# Altium PCB V3_Board.PcbDoc (part 6 of 7)
Units mil, origin at the board's own origin, x right, y up, seen from the top; angles counter-clockwise.
Board outline 6915 x 4422 mil, 2 copper layers (Top Layer, Bottom Layer), stack 57 mil thick; 364 components, 243 nets, 1048 pads, 599 vias.
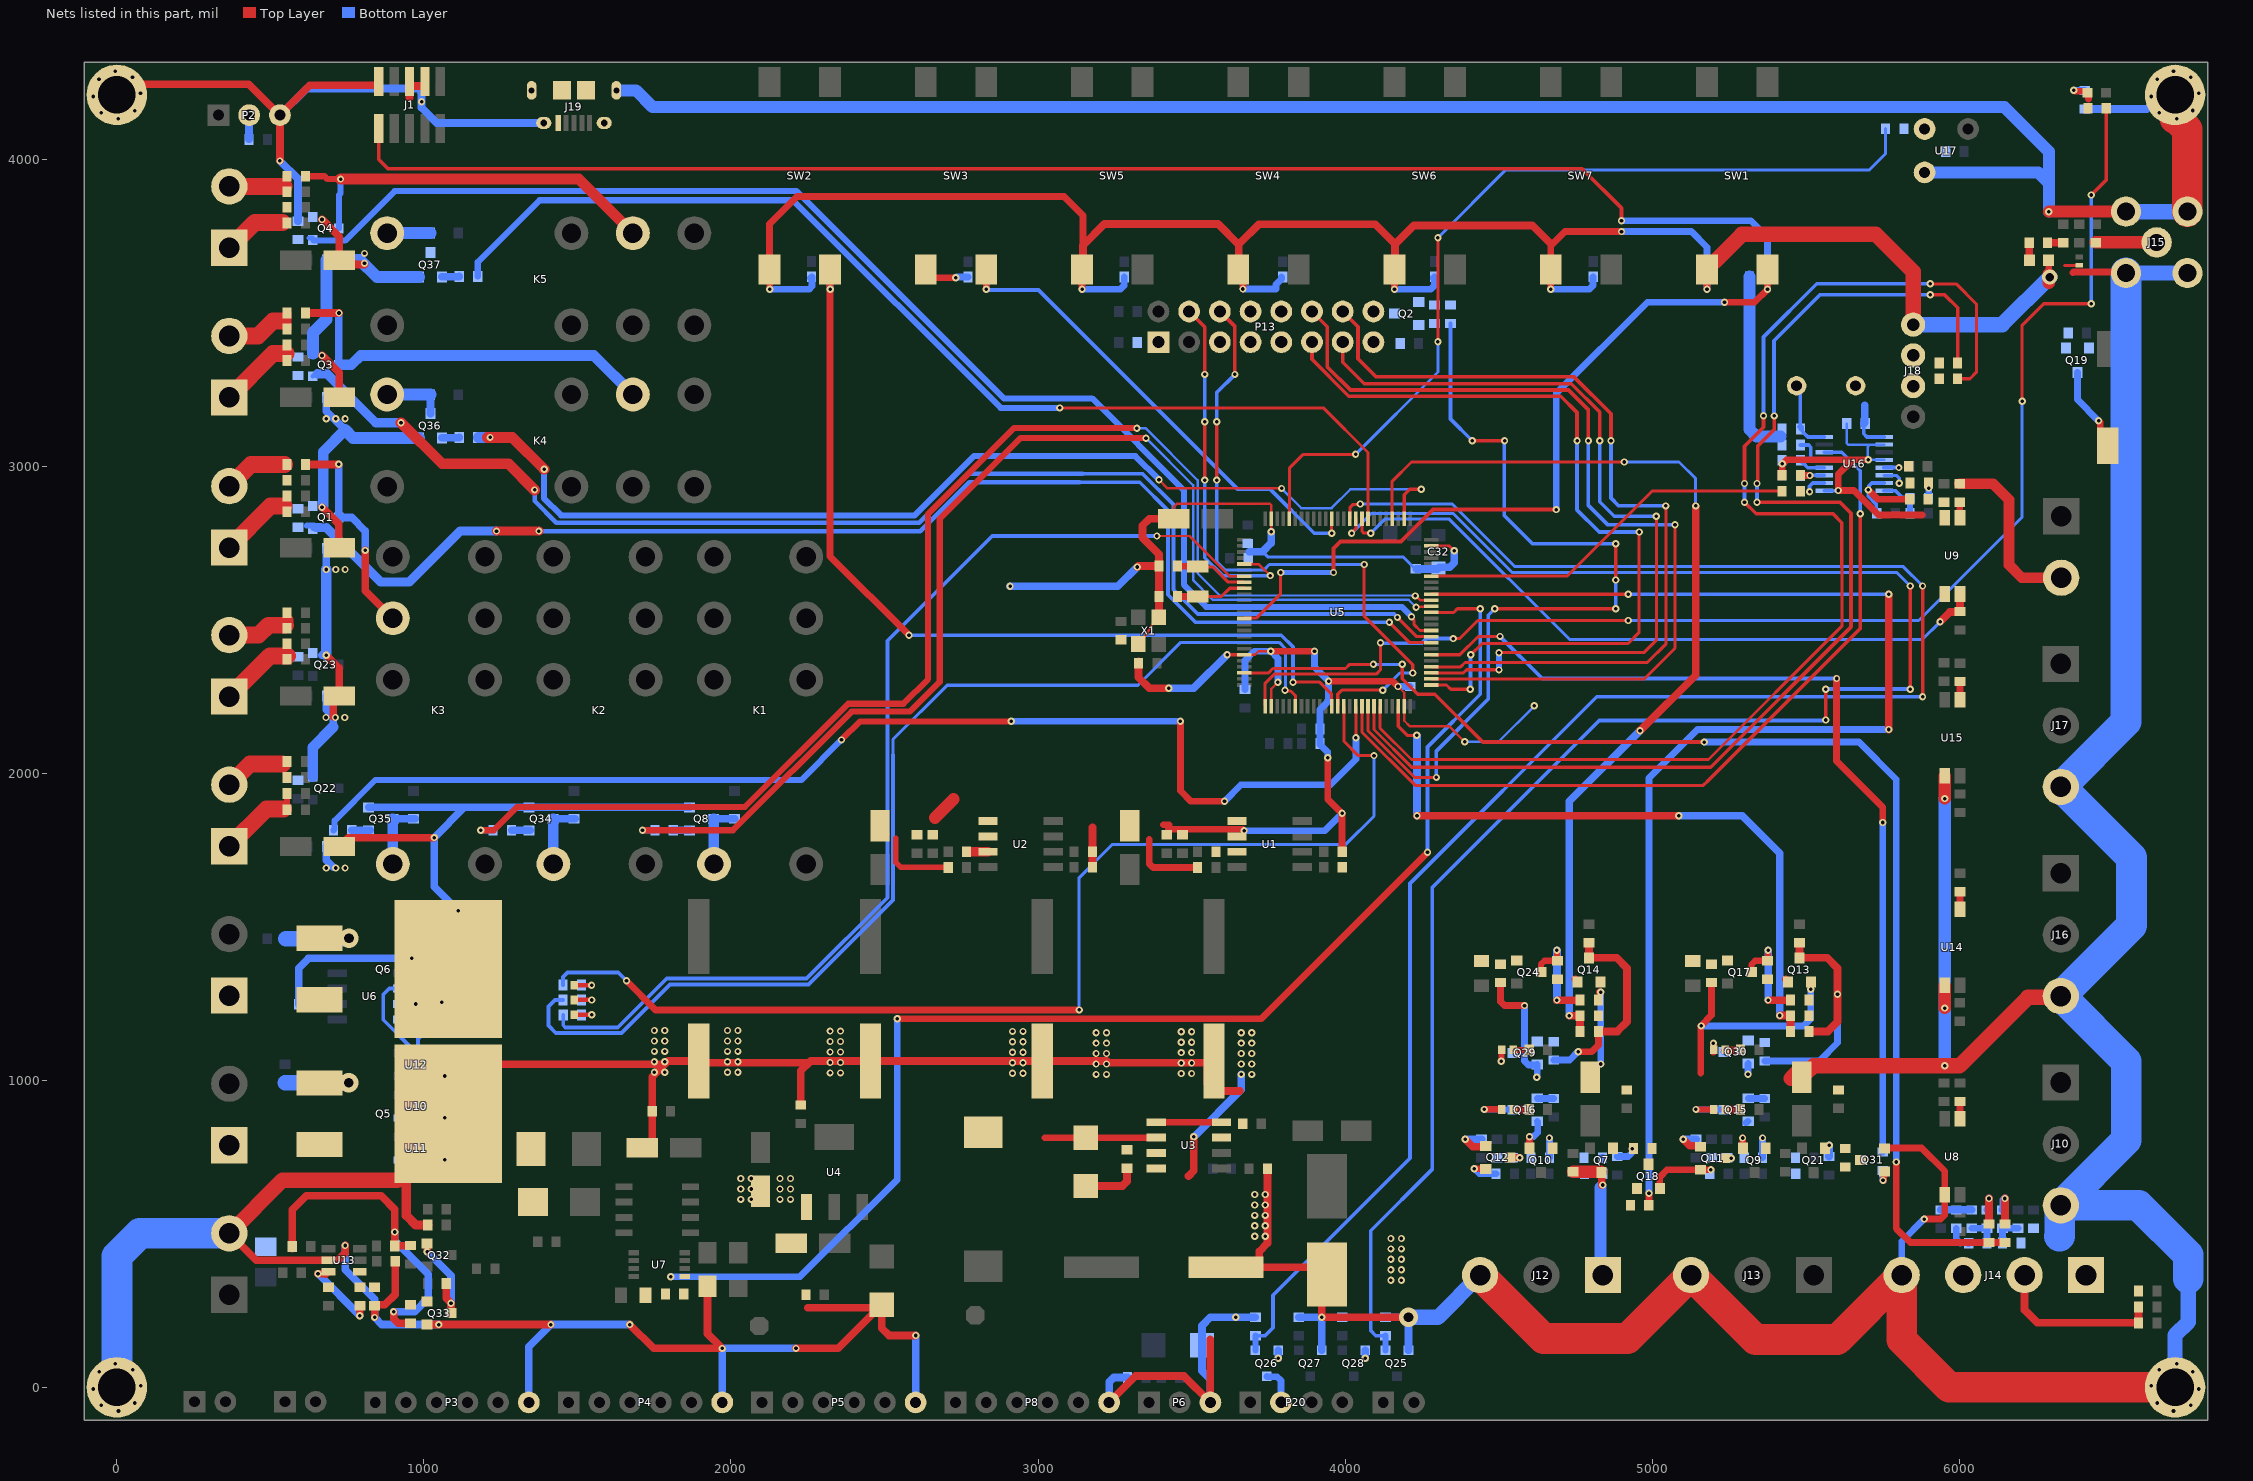
[diagram p3: the nets of this part, all layers, seen from the top]

## Via types
v1: diameter 23.62, hole 11.81, Top Layer to Bottom Layer, 557 vias
v2: diameter 62.99, hole 31.5, Top Layer to Bottom Layer, 31 vias
v3: diameter 50, hole 28, Top Layer to Bottom Layer, 11 vias

## Nets (pads, with @x,y where several pads share a name; then routed paths per layer and width w, separated by ;. In a path a pad name is that pad's centre, name@x,y a point inside that pad or via, vN(x,y) a via of type N, cw(c..) or ccw(c..) an arc to the next point about the centre after c; other vN are vias at no path point) (continued)
GND: C1.2 C2.1 C3.2 C4.2 C5.2 C6.2 C7.2 C8.2 C9.2 C10.2 C11.2 C12.2 C13.2 C14.2 C15.2 C16.2 C17.2 C18.2 C19.2 C20.1 C21.2 C22.2 C23.2 C24.2 C25.2 C26.2 C27.2 C28.2 C29.2 C30.2 C31.2 C32.2 C33.2 C34.1 C35.1 C36.2 C37.1 C38.1 C39.1 C40.1 C41.1 C42.2 C43.2 C44.1 C45.2 C46.2 C47.2 C48.2 C49.2 C50.2 C51.2 C52.2 C53.1 C54.2 C55.2 C57.1 C58.2 C59.2 C60.1 C61.2 C62.2 C63.2 C64.2 C65.2 C66.2 C67.2 C68.2 C69.2 C70.2 C71.1 C72.1 C73.1 C76.2 C78.1 C79.1 D1.2 D2.2 D3.1 J1.3 J1.5 J1.9 J2.2 J10.3 J12.3 J13.3 J14.3 J14.4 J15.2 J15.3 J15.4 J15.5 J16.3 J17.3 J18.1 J19.5 J19.MH1 J19.MH2 J19.MH3 J19.MH4 J19.MP1 J19.MP2 L3.2 L4.2 P2.3 P3.6 P4.6 P5.6 P6.3 P8.6 P13.1 P13.5 P13.7 P13.8 P13.9 P13.10 pad.MH1 Q1.2 Q2.2 Q3.2 Q4.2 Q5.2 Q6.2 Q8.2 Q9.2 Q10.2 Q11.2 Q12.2 Q13.2 Q14.2 Q15.2 Q16.2 Q18.2 Q19.2 Q22.2 Q23.2 Q25.2 Q26.2 Q27.2 Q28.2 Q29.2 Q30.2 Q31.2 Q33.2 Q34.2 Q35.2 Q36.2 Q37.2 R2.1 R4.2 R6.2 R7.1 R9.2 R10.1 R13.1 R26.2 R32.2 R34.2 R53.1 R59.1 R61.2 R65.1 R67.2 R69.2 R70.2 R72.2 R73.2 R74.2 R75.2 R83.2 R84.2 R86.1 R88.1 R91.1 R92.1 R97.2 R98.2 R103.2 R105.1 R113.1 SB6.2 SB41.2 SB42.2 SW1.1 SW2.1 SW3.1 SW4.1 SW5.1 SW6.1 SW7.1 U1.5 U1.6 U2.5 U2.6 U3.4 U4.1 U5.20 U5.27 U5.49 U5.74 U5.99 U6.3 U8.3 U9.2 U9.3 U10.3 U11.3 U12.3 U13.2 U14.3 U15.3 U16.2 U16.4 U16.9 U17.3 X1.2 X1.4 | length 55020.6
  Top Layer w8: X1.2@3326.54,2421.69 3350,2449 3373.84,2486.72 X1.4@3393.46,2508.31 ; C31.2@3442.13,2829 3442.13,2868.13 3452,2878 3754.65,2878 3759.33,2873.31 U5.99@3759.33,2829.28 v1(3759.33,2787) ; U5.20@3670.75,2386.36 3706.36,2386.36 3717.81,2397.81 v1(3758,2397.81) ; U5.27@3759.33,2219.04 3759.33,2275.33 v1(3781,2297) ; v1(4172,2283) 4192.4,2262.6 U5.49@4192.4,2219.04 4192.4,2171.4 4209.81,2154 4338,2154 v1(4389,2103)
  Top Layer w10: v1(3615.64,2386.36) U5.20@3670.75,2386.36 ; U5.74@4280.99,2740.69 4339.31,2740.69 v1(4355,2725) ; 6341.78,3654.22 L3.2@6390,3654.22
  Top Layer w18: 2537,1789.09 2537,1710.43 2553.54,1693.89 C18.2@2707.52,1693.89
  Top Layer w22: SW2.1@2126.02,3641.04 2126.02,3789.02 2215,3878 3085,3878 3146.62,3816.38 3146.62,3719.24 ; v1(2126.3,3576) SW2.1@2126.3,3640.76 ; SW3.1@2634.63,3641.04 2634.63,3638.43 2659.07,3614 v1(2732,3614) ; v1(3143.53,3576) SW5.1@3143.53,3640.76 ; 3362,1786 3362,1706.78 3374.89,1693.89 C6.2@3519.52,1693.89 ; 3408.5,1832.5 3427,1832.5 ; 3424,1818.5 3665.5,1818.5 v1(3671,1813) ; SW4.1@3652.15,3640.76 3667,3625.91 v1(3667,3577) ; v1(3758,2397.81) v1(3900,2397.81) ; v1(3943,2051) 3943,1917 v1(3990,1870) 3989.69,1869.69 3989.69,1745.73 C10.2@3990.52,1744.89 ; v1(3946.07,2300.19) 3946.38,2299.88 4155.12,2299.88 v1(4172,2283) ; v1(4160.77,3576) SW6.1@4160.77,3640.76 ; v1@4420.31,712.8 Q12.2@4457.43,712.8 ; R98.2@4506,1319 4506,1256.89 4518.89,1244 v1(4584,1244) ; Q10.2@4599.6,779.48 4599.8,779.68 4599.8,816.8 v1(4600,817) ; SW7.1@4669.1,3641.04 4669.1,3717.1 4716,3764 v1(4899.47,3764) ; v1(4669.38,3576) SW7.1@4669.38,3640.76 ; v1@4827,1288 v1(4832,1288) ; Q18.2@5024.4,648.63 5024.4,686.4 5047.6,709.6 Q11.2@5156.63,709.6 5156.93,709.3 v1(5190.7,709.3) ; 5158,1024.17 v1@5158,1178 ; v1@5158.25,1178 5158.56,1178 5159.81,1179.25 5159.81,1179.81 5193,1213 R97.2@5193,1319 ; v1(5178,3576) SW1.1@5178,3640.76 ; v1@5294.3,813 5294.3,779.78 Q9.2@5294.6,779.48 ; SB41.2@5422,2971 5422.69,2971.69 5422.69,3007.69 v1(5423,3008) 5423.44,3008 5436.44,3021 5653,3021 ; v1(5703,3021) 5653,3021 ; Q31.2@5762.37,779.4 5768.83,779.4 5769.48,780.05 5876.95,780.05 5952,705 U8.3@5952,627.98 5952,561.89 5939.11,549 v1(5885,549) ; 5879,2841 5737,2841 5657,2921 v1(5605,2921) 5605,2973 5653,3021 ; L4.2@6289.91,3671 6290.69,3670.22 6290.69,3625.31 v3@6291,3625 ; 6369,3630 6371.5,3632.5 6538.5,3632.5 J15.4@6542,3629
  Top Layer w25: pad.MH1@1.14,4208.89 36.45,4244.2 430.77,4244.2 P2.3@531.83,4143.14 ; J2.2@366.94,502.72 454.49,415.17 U13.2@689.96,415.17 690.26,415.47 720.47,415.47 744,439 v1(744,463) ; v1(531.83,3994.17) P2.3@531.83,4143.14 ; v1(669,2866.76) 723.83,2811.93 C24.2@723.83,2733 ; v1(669,3360.77) 725.01,3304.76 C65.2@725.01,3225.17 ; v1(669,3803.31) 725.01,3747.3 C67.2@725.01,3671.17 761.42,3671.17 775.59,3657 v1@807,3657 ; v1(683,2385) 725.01,2342.99 C63.2@725.01,2252.17 724,2252.17 705,2233.18 v1@705,2185 ; C61.2@725.18,1762 C61.2@725.01,1762.17 753.83,1791 v1(1034,1791) ; v1(840.14,228.94) R32.2@840.14,267.17 842.64,269.67 873.15,269.67 907,303.52 C69.2@907,412 ; J1.9@853.84,4239.99 628.67,4239.99 P2.3@531.83,4143.14 ; Q5.2@943,754.61 Q5.2@1073.72,885.33 ; 953.84,4199.63 953.84,4239.99 955.91,4237.92 J1.3@1001.77,4237.92 ; Q33.2@1010.63,205.6 v1(1048.86,205.6) v1(1414,205.6) ; Q5.2@1080.55,892.16 1241.39,1053 v1@1785,1053 ; v1(1671,205.6) 1748.6,128 v1(1971.89,128) 1924,175.89 R65.1@1924,330 ; C1.2@1711.76,781.02 1724.77,781.02 1743.77,800.02 C3.2@1743.77,900.12 1743.77,1011.77 v1@1785,1053 ; v1(2212,128) 2349.09,128 D2.2@2481.09,260 ; C26.2@2227.51,920.28 2227.51,1031.51 2259.6,1063.6 ; 2251,260 D2.2@2481.09,260 ; C17.2@2485.57,1828.98 2485.57,1819.11 C17.2@2504.57,1800.11 ; v1(2601.64,170) 2515,170 2491.29,193.71 D2.2@2491.29,270.2 D2.2@2481.09,260 ; C19.2@2657.31,1800.11 C19.2@2659.81,1800.11 ; SW5.1@3143.25,3641.04 3146.62,3644.41 3146.62,3719.24 3216.38,3789 3585.86,3789 3653.72,3721.14 ; D1.2@3155.27,656.61 3274.87,656.61 3289.52,671.26 C20.1@3289.52,714.78 ; C14.2@3177.52,1694.89 C15.2@3177.52,1744.89 3177.52,1824 ; P8.6@3231.39,-47.83 3317.22,38 3475.31,38 P6.3@3561.14,-47.83 3561.14,157.14 ; v1(3323,2672) 3326,2675 C53.1@3393.73,2675 ; C35.1@3327,2359 3327,2313 3363,2277 v1(3426,2277) ; C35.1@3327.77,2364.23 C35.1@3329,2363 ; X1.4@3393.46,2508.31 3393.73,2508.57 C53.1@3393.73,2675 ; C31.2@3442.13,2829 3363,2829 3340,2806 3340,2768 3394,2714 C53.1@3394,2675 C53.1@3393.73,2675 ; 3489.99,689.09 3507,706.1 v1(3507,817) ; C5.2@3573.22,1063.6 3573.22,987.95 C5.2@3595.17,966 ; C16.2@3611.96,392.13 C16.2@3698.36,392.13 ; SW4.1@3654,3642.61 3654,3722.62 3719.38,3788 4097.62,3788 4161.1,3724.52 ; 3657,966 C5.2@3595.17,966 ; R2.1@3747,713 3747,470 3720.31,443.31 3720.31,414.07 C16.2@3698.36,392.13 ; SW6.1@4160.77,3640.76 4162,3641.99 4162,3722 4224,3784 4609,3784 4669.1,3723.9 ; v2(4205.95,229.35) v1(3924.04,229.35) 3924.04,351.45 C9.2@3941.09,368.5 3917.47,392.13 C16.2@3698.36,392.13 ; v1@1785,1053 1795.6,1063.6 C12.2@1895.22,1063.6 1900.32,1058.5 2254.5,1058.5 2259.6,1063.6 ; 2259.6,1063.6 C13.2@2454.56,1063.6 C7.2@3013.89,1063.6 3223,1063.6 3228.91,1057.69 3551.28,1057.69 3551.28,987.95 3573.22,966 C5.2@3595.17,966
  Top Layer w30: Q5.2@943,754.61 943,561 974,530 R34.2@1013,530
  Top Layer w39.37: v1(5952,1236) U14.3@5952,1309.98 ; v1(5952,1918) U15.3@5952,1991.98 ; v3@6290.69,3596.23 v3@6290.69,3625.31 ; v1(6291,3829) J15.3@6542,3829
  Top Layer w40: 2664.5,1855.5 2725,1916
  Top Layer w50: J2.2@366.94,502.72 540.22,676 914.39,676 1080.55,842.16 Q5.2@1080.55,892.16 ; SW1.1@5177.72,3641.04 5177.72,3654.82 5188.15,3665.25 5201.93,3665.25 5291.67,3755 5728,3755 5849,3634 J18.1@5849,3461 ; 5451.59,1006.59 C43.2@5471.23,1026.23 ; C43.2@5487,1010.45 C43.2@5502.77,1026.23 ; C43.2@5493.5,1026.23 5493.5,1036.64 5513.18,1036.64 5524.55,1048 v1(5952,1048) 6000,1048 6222.71,1270.71 6325.71,1270.71 J16.3@6330,1275
  Top Layer w100: J12.3@4439.17,366.64 4645.81,160 4919.54,160 J13.3@5126.17,366.64 5335.81,157 5602.36,157 J14.4@5812,366.64 5812,156 5966.82,1.18 pad.MH1@6701.82,1.18 ; pad.MH1@6701.82,4131.99 pad.MH1@6701.82,4208.82 ; v1(6706.82,4131.99) 6742,4096.81 J15.2@6742,3829
  Bottom Layer w8: C33.2@4227.16,2666.33 C33.2@4229.66,2666.33 ; v1(4389,2103) 4499,2103 v1(4616,2220) ; U16.9@5559.56,2920.5 U16.9@5559.81,2920.75 ; C71.1@5633,3139 5633,3075.19 5637.69,3070.5 5708.5,3070.5 ; U16.4@5754.44,3020.5 5754.19,3020.75 5703.25,3020.75 v1(5703,3021) 5701,3023 5701,3063 5708.5,3070.5 ; U16.2@5754.44,3070.5 5708.5,3070.5
  Bottom Layer w10: 3730.8,2721.8 3747.59,2705 4188.49,2705 C33.2@4227.16,2666.33
  Bottom Layer w12: U16.9@5559.81,2920.75 5604.75,2920.75 v1(5605,2921)
  Bottom Layer w22: C25.2@683.05,2733.09 C25.2@683.14,2733.17 ; v1(2126.3,3576) 2254,3576 2264,3586 2264,3615.94 C37.1@2262.94,3617 C37.1@2258.94,3613 ; v1(2732,3614) 2732.44,3614 2734.44,3616 C38.1@2772.3,3616 ; v1(3143.53,3576) 3267.52,3576 3280.41,3588.89 C40.1@3280.41,3616 ; v1(3667,3577) 3774.64,3577 3774.64,3591.61 3792.53,3609.5 C39.1@3792.53,3616 ; v1(3671,1813) 3933,1813 v1(3990,1870) ; C29.2@3674,2273 3674,2368 3703.81,2397.81 v1(3758,2397.81) 3781,2374.81 v1(3781,2297) ; v1(3900,2397.81) 3900,2346.26 v1(3946.07,2300.19) 3946,2300.12 3946,2236 3918,2208 R13.1@3918,2145 C36.2@3918,2097 3918,2094.5 3943,2069.5 v1(3943,2051) ; v1(4160.77,3576) 4277.7,3576 4290.59,3588.89 C41.1@4290.59,3617 C41.1@4286.59,3613 ; v1(4172,2283) C27.2@4212.23,2283.01 ; v1(4420.11,713) 4420.55,713 4436.55,697 C47.2@4491,697 ; v1(4584,1244) 4584,1063.89 4596.89,1051 4623.77,1051 Q29.2@4625.37,1052.6 4625.37,1012.37 v1(4624,1011) ; v1(4600,817) 4600.31,817.31 4613.61,817.31 4627,830.7 4627,865.97 Q16.2@4625.37,867.6 ; v1(4669.38,3576) 4793.8,3576 4806.69,3588.89 4806.69,3615.94 C57.1@4807.74,3617 ; v1(4832,1054) v1(4832,1288) ; v1(4899.47,3764) 5127,3764 5178,3713 v1(5178,3576) ; v1(5159,1178) 5492,1178 5516,1202 v1(5516,1297) ; Q15.2@5305.26,862.46 5310.4,867.6 Q15.2@5312.37,867.6 ; v1(5311.31,1020.81) 5311.62,1021.12 5311.62,1054.85 Q30.2@5312.37,1055.6 ; J14.4@5812,366.64 5812,476 v1(5885,549) ; R105.1@5899,2895.67 5899.69,2896.36 5899.69,2928.69 v1(5900,2929) ; R113.1@5989.33,519 5989.33,483.83 6002.22,470.95 ; J14.3@6012,366.64 J14.3@6029,383.64 ; C79.1@6027.05,470.95 6029,469 C79.1@6030,470
  Bottom Layer w25: J2.2@366.94,502.72 J2.2@381.09,502.72 ; v1(531.83,3994.17) 590.86,3935.14 R9.2@590.86,3798 ; P2.3@531.83,4143.14 618.69,4230 C51.2@994,4230 993,4229 993,4167 1042.3,4117.7 J19.MH2@1390.78,4117.7 ; C55.2@593.14,1248.17 593.14,1366.14 625,1398 v1(961,1398) ; 669,2385 v1@672.5,2388.5 ; v1(669,2866.76) v1@672.5,2870.26 ; C62.2@682.14,1762.17 C62.2@683.14,1762.17 683.14,1716.86 v1@705,1695 ; v1(683,2664) 683.05,2664.05 C25.2@683.05,2733.09 ; C64.2@683.14,2252.17 683.14,2206.86 705,2185 705,2151 ; C66.2@683.14,3224.17 683.14,3178.86 744,3118 ; v1(744,463) 744,384 840.14,287.86 v1(840.14,228.94) 863.49,205.6 v1(1048.86,205.6) ; Q35.2@820.63,1889.4 1132.4,1889.4 ; U6.3@931.37,1249.4 v1(973.82,1249.4) ; U11.3@1026.32,741.77 1026.55,742 v1(1069,742) ; U10.3@1026.55,878.5 v1(1069,878.5) ; U12.3@1026.55,1015 v1(1069,1015) ; R84.2@1058.14,1199.17 1058.14,1255.27 v1(1058.37,1255.49) R83.2@1058.37,1297.94 ; v1(1112,1553) 1034,1631 v1(1034,1791) 1132.4,1889.4 ; P3.6@1342.14,-47.83 1342.14,133.74 v1(1414,205.6) v1(1671,205.6) ; Q8.2@1865.26,1889.4 Q34.2@1342.63,1889.4 1132.4,1889.4 ; P4.6@1971.89,-47.83 v1(1971.89,128) v1(2212,128) ; P5.6@2601.64,-47.83 v1(2601.64,170) ; v1(2909,2609) 3260,2609 v1(3323,2672) ; P8.6@3231.39,-47.83 3231.39,18.53 3246.04,33.17 C52.2@3291.14,33.17 ; v1(3426,2277) 3506.27,2277 v1(3615.64,2386.36) ; v1(3507,817) 3508,817 3662,971 v1(3662,1020) ; P6.3@3561.14,-47.83 3561.14,27.86 3533.88,55.12 D3.1@3533.88,138.17 3533.88,201.88 3561,229 v1(3644,229) 3644.17,229.17 R73.2@3707.73,229.17 ; 3687.96,2721.8 3730.8,2721.8 3759.33,2750.33 v1(3759.33,2787) ; v1(3782.54,96) Q26.2@3782.54,121.5 ; R74.2@3849.23,229.17 v1@3924.04,229.17 ; Q27.2@3924.04,121.5 v1@3924.04,229.17 ; v1(3924.04,229.35) v1@3924.04,229.17 ; v1(4065.54,96) Q28.2@4065.54,121.5 ; R72.2@4131.14,229.17 v2@4183.7,229.17 ; v2@4183.88,229.35 v2(4205.95,229.35) Q25.2@4205.95,121.5 ; C33.2@4232.16,2665.33 4300.67,2665.33 C32.2@4304,2668.65 4306.35,2671 4340.36,2671 4355,2685.64 v1(4355,2725) ; 6430,4163 6609.5,4163 6655.32,4208.82 pad.MH1@6701.82,4208.82
  Bottom Layer w35: Q22.2@638.54,1989.57 638.54,2084.54 705,2151 ; v1@672.5,2870.26 672.5,3046.5 744,3118 ; v1(683,2385) v1(683,2664)
  Bottom Layer w39.37: Q3.2@639,3367.57 639,3434 683.14,3478.14 C68.2@683.14,3671.17 792.83,3671.17 847.37,3616.63 Q37.2@984.6,3616.63 ; 744,3118 769.39,3092.61 Q36.2@984.6,3092.61 ; J19.MH3@1635,4224 1691,4224 1745.08,4169.92 ; 1752,4169.92 6146.08,4169.92 6291,4025 6291,3922 ; C73.1@5316,3617 5316,3120.06 5339.06,3097 5417,3097 ; U17.3@5886.58,3956.58 6256.42,3956.58 6291,3922 ; v1@5952,1044 v1(5952,1048) v1(5952,1236) v1(5952,1918) ; v1(6291,3829) 6291,3922
  Bottom Layer w50: v2(4205.95,229.35) 4301.88,229.35 J12.3@4439.17,366.64 ; J18.1@5849,3461 6139,3461 v3(6294,3616) ; J15.4@6542,3629 J15.5@6742,3629 ; J15.3@6542,3829 J15.2@6742,3829 ; pad.MH1@6701.82,1.18 6701.82,170.82 6745,214 6745,355
  Bottom Layer w100: pad.MH1@1.18,1.18 1.18,428.18 75.72,502.72 J2.2@366.94,502.72 ; 6326,493 6326.53,493.53 6326.53,590.2 J10.3@6330,593.67 ; J15.4@6542,3629 6542,2168.33 J17.3@6330,1956.33 6560,1726.33 6560,1505 J16.3@6330,1275 6543,1062 6543,806.67 J10.3@6330,593.67 ; 6745,355 6745,432 6583.33,593.67 J10.3@6330,593.67
  other v1: 6.18,-75.99 6696.82,-75.99 -49.73,-56.97 6752.73,-56.97 59.16,-49.9 6643.84,-49.9 -75.82,-3.99 6778.82,-3.99 78.18,6.01 6624.82,6.01 -56.8,51.93 6759.81,51.93 52.09,59 6650.91,59 -3.82,78.01 6706.82,78.01 4149,350 4183,350 4149,384 4183,384 4149,418 4183,418 4149,452 4183,452 4149,486 4183,486 3706,493 3740,493 3706,527 3740,527 3706,561 3740,561 3706,595 3740,595 2032,613 2066,613 2160,613 2194,613 3706,629 3740,629 2032,647 2066,647 2160,647 2194,647 2032,681 2066,681 2160,681 2194,681 5294,813 3189,1020 3223,1020 3696,1020 3466,1023 3500,1023 2917,1024 2951,1024 2323,1025 2357,1025 1751,1027 1785,1027 1989,1027 2023,1027 3189,1054 3223,1054 3662,1054 3696,1054 3466,1057 3500,1057 2917,1058 2951,1058 2323,1059 2357,1059 1751,1061 1785,1061 1989,1061 2023,1061 3189,1088 3223,1088 3662,1088 3696,1088 3466,1091 3500,1091 2917,1092 2951,1092 2323,1093 2357,1093 1751,1095 1785,1095 1989,1095 2023,1095 3189,1122 3223,1122 3662,1122 3696,1122 3466,1125 3500,1125 2917,1126 2951,1126 2323,1127 2357,1127 1751,1129 1785,1129 1989,1129 2023,1129 3189,1156 3223,1156 3662,1156 3696,1156 3466,1159 3500,1159 2917,1160 2951,1160 2323,1161 2357,1161 1751,1163 1785,1163 1989,1163 2023,1163 683,1692 713.5,1692 744,1692 681.99,2182 712.49,2182 742.99,2182 713.5,2664 744,2664 683,3155 713.5,3155 744,3155 807,3661 807,3693 5.98,4131.89 -49.93,4150.9 6650.91,4151 58.96,4157.97 6759.81,4158.07 993,4187 -76.02,4203.89 6624.82,4203.99 77.98,4213.89 6778.82,4213.99 -57.01,4259.8 6643.84,4259.9 51.89,4266.87 6752.73,4266.97 -4.02,4285.89 6696.82,4285.99
GND_DRV_1: J3.1 Q5.3
GND_DRV_2: J4.1 Q6.3
HEAT_CNTRL: R33.1 U5.56 | length 3004.6
  Top Layer w10: U5.56@4280.99,2386.36 4373.36,2386.36 4433,2446 v1(4504,2446)
  Top Layer w22: v1(5600,2309) 5600,2040 5750,1890 v1(5750,1840)
  Bottom Layer w12: v1@4504.44,2446 4641.44,2309 v1(5600,2309)
  Bottom Layer w22: v1(4504,2446) v1@4504.44,2446 ; R33.1@5750,767 v1(5750,1840)
HEATER: C44.2 J12.1 Q7.3 R26.1 SB2.2 | length 514.4
  Top Layer w25: SB2.2@4742,703 4743.13,701.87 4833.73,701.87 Q7.3@4834.86,700.74 v1@4834.86,660
  Top Layer w40: SB2.2@4742,703 Q7.3@4831.74,703
  Bottom Layer w25: C44.2@4838,749 C44.2@4838.5,748.5 ; R26.1@4838.5,697.5 R26.1@4839,697
  Bottom Layer w40: v1@4831,652 4831,374.81 J12.1@4839.17,366.64
  other v1: 4839,660
IN+: R11.1 R30.2 U13.3 | length 258.4
  Top Layer w25: v1(656,371) U13.3@680.14,371 ; U13.3@680.14,370 680.41,370.27 U13.3@680.41,377.48 ; U13.3@689.66,377.48 U13.3@689.96,377.77 ; v1(792,234) 792,266.73 R30.2@792.14,266.87
  Bottom Layer w25: v1(656,371) 792,235 v1(792,234)
IN-: R30.1 R32.1 U13.4
INA_1#: R83.1 U6.2 U10.4 | length 613.6
  Bottom Layer w12: U10.4@923.96,878.27 955.11,878.27 962.14,885.3 962.14,1104.11 868,1198.25 868,1280 888,1300 930.31,1300 U6.2@931.14,1299.17
  Bottom Layer w22: U6.2@931.14,1299.17 R83.1@998.14,1299.17
INB_1#: R84.1 U6.4 U11.4 | length 572.4
  Bottom Layer w12: U11.4@923.96,741.77 926.71,744.52 956.13,744.52 981.14,769.53 981.14,1135.17 998.14,1152.17 R84.1@998.14,1199.17
  Bottom Layer w22: U6.4@931.14,1199.17 R84.1@998.14,1199.17
IND1: LED5.2 Q16.3 | length 149
  Top Layer w20: v1@4453.57,906.5 LED5.2@4508.91,906.5
  Bottom Layer w20: v1(4453.07,906) Q16.3@4546.7,906
IND2: LED4.2 Q15.3 | length 147.6
  Top Layer w20: v1(5142,906) 5197.09,906 LED4.2@5197.09,905.5
  Bottom Layer w20: v1(5142,906) 5142.5,905.5 5233.13,905.5 Q15.3@5233.63,905
IND3: LED6.2 Q29.3 | length 33.8
  Top Layer w20: v1(4508,1063) 4508.67,1063.67 4508.67,1095.83 LED6.2@4509.34,1095.83
IND4: LED7.2 Q30.3 | length 32.2
  Top Layer w20: v1(5198.95,1121.07) 5198.95,1091.31 LED7.2@5199.26,1091
  Bottom Layer w20: Q30.3@5231.66,1093 Q30.3@5233.63,1093
IO_A11: R15.1 U5.31 | length 3581.3
  Top Layer w10: v1(3804,2271) 3806.61,2268.39 3822.61,2268.39 3838.07,2252.93 U5.31@3838.07,2219.04
  Bottom Layer w10: 2528,2060.5 2528,2111 2704,2287 3325.39,2287 3465.2,2426.81 3785.19,2426.81 3806,2406 3806,2273 v1(3804,2271)
  Bottom Layer w12: R15.1@1453.45,1262.46 1427.46,1262.46 1406,1241 1406,1179 1430,1155 1644,1155 1802,1313 2253,1313 2528,1588 2528,2060.5
IO_A12: R17.1 U5.39 | length 3665.6
  Top Layer w10: U5.39@3995.55,2219.04 3995.55,2105.45 4043,2058 v1(4094,2058)
  Top Layer w22: v1(1660,1325) 1755,1230 v1(3134,1230)
  Bottom Layer w10: v1(3134,1230) 3134,1660.59 3242.41,1769 4002,1769 4094,1861 v1(4094,2058)
  Bottom Layer w12: R17.1@1453.45,1311.22 1453.45,1337.45 1468,1352 1633,1352 v1(1660,1325)
IO_C9: R28.1 U5.66 | length 4168.4
  Top Layer w10: U5.66@4280.99,2583.21 v1(4922,2583.21)
  Top Layer w22: R28.1@4985.69,593.69 4989,597 v1(4989,633)
  Top Layer w25: v1(5770,2143) v1(5770,2583.21)
  Bottom Layer w12: v1(4922,2583.21) v1(5770,2583.21)
  Bottom Layer w22: v1(4989,633) 4989,1985 5147,2143 v1(5770,2143)
IO_C13: R14.1 U5.7 | length 3460.3
  Top Layer w8: v1(3387,2773) 3493,2773 3623.73,2642.27 U5.7@3670.75,2642.27
  Bottom Layer w12: R14.1@1453.95,1213.69 1453.95,1180.03 1460.98,1173 1632,1173 1791,1332 2246.54,1332 2510,1595.46 2510,2432 2851,2773 v1(3387,2773)
"IPK SNS": R3.1 U3.1 U3.7 U3.8 | length 212.6
  Top Layer w22: U3.1@3384.99,864.09 U3.8@3597.59,864.09
LCD_DB4: P13.11 U5.51 | length 2691.2
  Top Layer w10: U5.51@4280.99,2287.94 4330.14,2287.94 4344.08,2274 v1(4407,2274) ; v1(4409,2386) 4446.19,2423.19 4921.19,2423.19 4957.19,2459.19 v1(4957.19,2786)
  Top Layer w12: P13.11@3892,3404 3894,3402 3892,3400 3892,3348.04 4012.04,3228 4702,3228 4755,3175 v1(4755,3083)
  Bottom Layer w12: v1(4407,2274) 4408,2275 4408,2385 v1(4409,2386) ; v1(4755,3083) 4755,2858 4827,2786 v1(4957.19,2786)
LCD_DB5: P13.12 U5.52 | length 2964.7
  Top Layer w10: U5.52@4280.99,2307.62 4545,2307.62 4973.62,2307.62 5074,2408 v1(5074,2810)
  Top Layer w12: P13.12@3892,3504 3942,3454 3942,3323.5 4017.5,3248 4727.28,3248 4791.83,3183.45 v1(4791.83,3083)
  Bottom Layer w12: v1(4791.83,3083) 4791.83,2872.49 4854.32,2810 v1(5074,2810)
LCD_DB6: P13.13 U5.53 | length 2677.4
  Top Layer w10: U5.53@4280.99,2327.31 4385.31,2327.31 4395.5,2337.5 4500.5,2337.5 v1(4501,2337) ; v1(4501,2393) 4972,2393 5013,2434 v1(5013,2837)
  Top Layer w12: P13.13@3992,3404 3992,3339 4062,3269 4735.98,3269 4828.67,3176.32 v1(4828.67,3083)
  Bottom Layer w12: v1(4828.67,3083) 4828.67,2884.33 4876,2837 v1(5013,2837)
  Bottom Layer w20: v1(4501,2337) v1(4501,2393)
LCD_DB7: P13.14 U5.54 | length 2779.3
  Top Layer w10: U5.54@4280.99,2346.99 4375.99,2346.99 4390,2361 4984,2361 5044,2421 v1(5044,2871)
  Top Layer w12: P13.14@3992,3504 4042,3454 4042,3350 4101,3291 4745.1,3291 4865.5,3170.6 v1(4865.5,3083)
  Bottom Layer w12: v1(4865.5,3083) 4865.5,2896.5 4891,2871 v1(5044,2871)
LCD_EN: P13.6 U5.38 | length 2090.6
  Top Layer w10: U5.38@3975.87,2219.04 3975.87,2257.87 3989,2271 v1(4122,2271) ; v1(4062,2680) 4062,2512 4220,2354 v1(4220,2327)
  Top Layer w12: v1(3582,2955) v1(3582,3145) ; P13.6@3592,3504 3641,3455 v1(3641,3299)
  Bottom Layer w10: v1(3582,2955) 3582,2689.21 3609.26,2661.95 3734.95,2661.95 3753,2680 v1(4062,2680) ; v1(4122,2271) 4178,2327 v1(4220,2327)
  Bottom Layer w12: v1(3582,3145) 3582,3240 v1(3641,3299) ; v1@3639.43,3300.57 3639.73,3300.87 v1@3639.73,3302.73
LCD_RS: P13.4 U5.5 | length 1161
  Top Layer w8: U5.5@3670.75,2681.64 3718.36,2681.64 v1(3756,2644)
  Top Layer w12: P13.4@3492,3504 3543,3453 v1(3543,3299) ; v1(3543,2955) v1(3543,3145)
  Bottom Layer w12: v1(3543,2955) 3543,2701.93 3600.93,2644 v1(3756,2644) ; v1(3543,3145) v1(3543,3299)
LED_SIG.R_CNTRL: Q26.1 R73.1 U5.86 | length 6044.4
  Top Layer w10: U5.86@4015.24,2829.28 4015.24,2865.24 4026.19,2876.19 4048.19,2876.19 v1(4049,2877)
  Top Layer w12: v1(5880,2250) v1(5880,2610)
  Bottom Layer w10: v1(4049,2877) 4349,2877 4553,2673 5817,2673 v1(5880,2610)
  Bottom Layer w12: R73.1@3707.73,169.17 3739.17,169.17 3765,195 3765,301 4211,747 4211,1642 4819,2250 v1(5880,2250)
  Bottom Layer w20: Q26.1@3707.73,121.5 R73.1@3707.73,169.17
LED_SIG.W_LED_CNTRL: Q25.1 R72.1 U5.85 | length 5842.9
  Top Layer w10: v1(4020.92,2782.17) 4034.92,2796.17 U5.85@4034.92,2829.28
  Top Layer w12: v1(5565,2174) v1(5565,2274) v1@5565,2280 ; v1(5840,2274) v1(5840,2610)
  Bottom Layer w10: v1(4020.92,2782.17) 4084.75,2846 4352,2846 4544,2654 5796,2654 v1(5840,2610)
  Bottom Layer w12: 4083,185.88 4099.7,169.17 R72.1@4131.14,169.17 ; 4083,192 4083,510.7 4283,710.7 4283,1628 4827.19,2172.19 5563.19,2172.19 v1(5565,2174) ; v1@5565,2275 v1@5840,2275
  Bottom Layer w20: Q25.1@4131.14,121.5 R72.1@4131.14,169.17
LEVEL_IN: J11.2 R80.2 | length 581.9
  Top Layer w35: R80.2@6000,2943 6109,2943 6161,2891 6161,2679 6203,2637 J11.2@6331,2637
LEVEL_MCU: R79.1 U5.84 U9.4 | length 2263.6
  Top Layer w10: U5.84@4054.61,2829.28 4054.61,2788.03 4060.47,2782.17 v1(4083.14,2782.17)
  Top Layer w25: v1(5937,2494) 5968.23,2525.23 5997.73,2525.23 R79.1@5999.5,2527 ; R79.1@6002,2528 U9.4@6002,2583.98
  Bottom Layer w10: v1(4083.14,2782.17) 4128.97,2828 4339,2828 4731,2436 5879,2436 v1(5937,2494)
MEM_CNTRL: Q1.1 R4.1 U5.58 | length 4258
  Top Layer w10: v1(4144,2492) 4210.27,2425.73 U5.58@4280.99,2425.73
  Top Layer w30: v1(1237,2789) v1(1375,2789)
  Bottom Layer w12: 3135,2948 3331,2948 3423,2856 3423,2582 3513,2492 v1(4144,2492)
  Bottom Layer w15: 617.66,2804.1 620.69,2807.13 ; Q1.1@639,2796 Q1.1@643,2800 ; v1(1375,2789) 2616.7,2789 2775.7,2948 3135,2948
  Bottom Layer w20: 620.69,2807.13 643,2807.13 Q1.1@649.57,2800.56
  Bottom Layer w30: Q1.1@649.57,2800.56 682.44,2800.56 860,2623 953,2623 1119,2789 v1(1237,2789)
MEM_SAVER: K3.6 Q1.3 SB25.1 | length 701.9
  Top Layer w25: SB25.1@614.84,3006 v1@723.65,3006 ; v1(810,2726) 810,2594.5 K3.6@899.5,2505
  Bottom Layer w25: v1@723.65,3000.65 Q1.3@723.65,2833.4 765.6,2833.4 810,2789 v1(810,2726)
  other v1: 723.65,3006.65
NetC20_2: C20.2 U3.3
NetC42_1: C42.1 R110.2 R111.2 | length 98.5
  Bottom Layer w22: C42.1@6140,471 6140.17,471.17 6140.17,518.83 R111.2@6140.33,519 R110.2@6190.67,519
NetC54_1: C54.1 U16.12 | length 88.9
  Bottom Layer w12: C54.1@5482,3019.33 5482,3016.83 5491,3007.83 5493.5,3007.83 5505.83,2995.5 U16.12@5559.56,2995.5
NetC70_1: C70.1 U16.13 | length 117.6
  Bottom Layer w12: C70.1@5482,3069 5508.97,3069 5516,3061.97 5516,3029 5524.06,3020.94 U16.13@5559.11,3020.94 ; U16.13@5558.67,3021.39 U16.13@5559.11,3020.94 ; U16.13@5559.56,3020.5 U16.13@5559.11,3020.94
NetC77_2: C77.2 SB16.1 | length 51
  Top Layer w25: C77.2@6287,3728 SB16.1@6338,3728
NetC79_2: C79.2 R114.1 R115.2 | length 99.3
  Bottom Layer w22: R114.1@6039.67,519 R115.2@6090,519 C79.2@6090,470
NetD1_1: D1.1 L2.1 U3.2 | length 350
  Top Layer w22: 3022.2,814.09 D1.1@3155.27,814.09 ; D1.1@3169.05,816.46 3171.41,814.09 U3.2@3384.99,814.09
NetD4_2: D4.2 K1.8 Q8.3 | length 215.2
  Bottom Layer w25: Q8.3@1944,1852 1944.22,1852.22 2011.41,1852.22 D4.2@2011.63,1852.45
  Bottom Layer w29.53: Q8.3@1944,1852 Q8.3@1944.5,1851.5 ; K1.8@1944.5,1705.5 K1.8@1945,1705
  Bottom Layer w35: K1.8@1944.5,1705.5 Q8.3@1944.5,1851.5
NetD5_2: D5.2 K2.8 Q34.3 | length 215.2
  Bottom Layer w25: Q34.3@1421.59,1852.22 Q34.3@1425.59,1852.22 ; Q34.3@1425.37,1852 Q34.3@1425.59,1852.22 ; D5.2@1488.78,1852.22 Q34.3@1425.59,1852.22 ; D5.2@1492.78,1852.22 D5.2@1493,1852.45
  Bottom Layer w29.53: Q34.3@1421.37,1852 Q34.3@1421.81,1851.56 ; K2.8@1421.81,1705.44 K2.8@1422.25,1705
  Bottom Layer w35: K2.8@1421.81,1705.44 Q34.3@1421.81,1851.56
NetD6_2: D6.2 D7.2
NetD8_2: D8.2 K3.8 Q35.3 | length 214.9
  Bottom Layer w25: Q35.3@899.59,1852.22 Q35.3@904.59,1852.22 ; Q35.3@904.37,1852 Q35.3@904.59,1852.22 ; D8.2@966.78,1852.22 Q35.3@904.59,1852.22 ; D8.2@971.78,1852.22 D8.2@972,1852.45
  Bottom Layer w29.53: Q35.3@899.37,1852 Q35.3@899.44,1851.93 ; K3.8@899.44,1705.06 K3.8@899.5,1705
  Bottom Layer w35: K3.8@899.44,1705.06 Q35.3@899.44,1851.93
NetD9_2: D9.2 K4.8 Q36.3 | length 202.8
  Bottom Layer w25: D9.2@1021.72,3233 1021.86,3232.86 1021.86,3171.49 Q36.3@1022,3171.35
  Bottom Layer w39.37: K4.8@881,3233.75 1020.97,3233.75 D9.2@1021.72,3233
NetD10_2: D10.2 K5.8 Q37.3 | length 140.7
  Bottom Layer w39.37: K5.8@881,3759 D10.2@1021.72,3759
NetJ5_1: J5.1 SB10.2 SB11.2 | length 256.4
  Top Layer w20: 554.84,1904 SB10.2@554.84,1934.33
  Top Layer w55: J5.1@366.94,1763.17 487.79,1884.02 SB11.2@543,1884.02
NetJ5_2: J5.2 SB12.2 SB13.2 | length 201.9
  Top Layer w55: J5.2@366.94,1963.17 434.27,2030.5 SB12.2@541,2030.5
NetJ6_1: J6.1 SB14.2 SB15.2 | length 243.7
  Top Layer w55: J6.1@366.94,2250.17 498.77,2382 SB15.2@556,2382
NetJ6_2: J6.2 SB21.2 SB22.2 | length 206.4
  Top Layer w39.37: SB22.2@556.31,2489.32 556.31,2499.81
  Top Layer w55: J6.2@366.94,2450.17 462.17,2450.17 494.5,2482.5 SB22.2@549.49,2482.5
NetJ7_1: J7.1 SB23.2 SB24.2 | length 234.9
  Top Layer w55: J7.1@366.94,2735.17 501.77,2870 546,2870
NetJ7_2: J7.2 SB25.2 SB26.2 | length 209.4
  Top Layer w55: J7.2@366.94,2935.17 437.77,3006 SB25.2@547,3006
NetJ8_1: J8.1 SB27.2 SB28.2 | length 243.2
  Top Layer w55: J8.1@366.94,3224.17 509.77,3367 551,3367
NetJ8_2: J8.2 SB29.2 SB30.2 | length 243.3
  Top Layer w29.53: SB30.2@554.84,3447 SB29.2@554.84,3499
  Top Layer w55: J8.2@366.94,3424.17 460.17,3424.17 509,3473 538,3473
NetJ9_1: J9.1 SB31.2 SB32.2 | length 207.4
  Top Layer w55: J9.1@366.94,3711.17 449.79,3794.02 SB32.2@540,3794.02
NetJ9_2: J9.2 SB33.2 SB34.2 | length 180.6
  Top Layer w29.53: SB33.2@554.84,3941.5 SB33.2@554.84,3944
  Top Layer w55: J9.2@366.94,3911.17 SB34.2@545,3911.17
NetJ14_1: J14.1 SB5.2
NetJ14_2: J14.2 SB35.2 SB36.2 | length 554
  Top Layer w25: J14.2@6212,366.64 6212,253 6254,211 SB36.2@6583,211 SB35.2@6583,263
NetJ15_1: J15.1 SB4.2 | length 198
  Top Layer w40: SB4.2@6444,3729 J15.1@6642,3729
NetJ18_2: J18.2 SB19.2
NetJ18_3: J18.3 SB20.2
NetLED1_2: LED1.2 R14.2 | length 89.2
  Top Layer w12: LED1.2@1490.65,1214.56 LED1.2@1490.79,1214.42 ; v1@1546.58,1214.42 v1(1546.72,1214.28)
  Top Layer w15: LED1.2@1490.79,1214.42 v1@1546.58,1214.42
  Bottom Layer w12: R14.2@1513.95,1213.69 1514.25,1213.99 1546.42,1213.99 v1(1546.72,1214.28)
NetLED2_2: LED2.2 R15.2 | length 89.4
  Top Layer w12: LED2.2@1490.65,1262.63 LED2.2@1490.74,1262.54 ; v1@1546.63,1262.54 v1(1546.72,1262.46)
  Top Layer w15: LED2.2@1490.74,1262.54 v1@1546.63,1262.54
  Bottom Layer w12: R15.2@1513.45,1262.46 v1(1546.72,1262.46)
NetLED3_2: LED3.2 R17.2 | length 101.2
  Top Layer w10: LED3.2@1490.65,1310.69 LED3.2@1495.97,1305.38
  Top Layer w15: LED3.2@1490.65,1310.69 v1@1546.55,1310.69
  Bottom Layer w10: R17.2@1513.45,1311.22 1514.07,1310.61 1550.12,1310.61 v1@1550.74,1311.22
  other v1: 1546.63,1310.61
NetLED4_1: LED4.1 R50.1 | length 52.3
  Top Layer w25: LED4.1@5236.7,906 R50.1@5288.96,906
NetLED5_1: LED5.1 R51.1 | length 52.3
  Top Layer w25: LED5.1@4546.7,906 R51.1@4599,906
NetLED6_1: LED6.1 R93.1 | length 52.3
  Top Layer w20: LED6.1@4546.74,1100 R93.1@4599,1100
NetLED7_1: LED7.1 R94.1 | length 52.3
  Top Layer w25: LED7.1@5236.66,1099 R94.1@5288.92,1099
NetLED8_2: LED8.2 R53.2 SB3.1 | length 102.6
  Top Layer w22: v1(6372,4224) 6372.44,4224 6375.3,4221.14 6412.33,4221.14 LED8.2@6414.47,4219 ; LED8.2@6417.47,4216 6420.19,4213.28 6420.19,4195.5
  Bottom Layer w22: v1(6372,4224) 6372.31,4223.69 6407.31,4223.69 R53.2@6408,4223
NetLS1_2: LS1.2 Q19.3 | length 280.2
  Top Layer w22: v1(6453,3148) 6458.71,3142.29 6458.71,3091.13 LS1.2@6483.14,3066.69
  Bottom Layer w22: Q19.3@6383.87,3305.79 6383.87,3217.13 v1(6453,3148)
NetP2_2: P2.2 R16.2 | length 79.5
  Bottom Layer w20: R16.2@431,4064 R16.2@431.41,4064.41 ; P2.2@431.41,4142.73 P2.2@431.83,4143.14
  Bottom Layer w25: R16.2@431.41,4064.41 P2.2@431.41,4142.73
NetP13_15: P13.15 R57.1
NetQ2_1: Q2.1 R60.1 R61.1
NetQ5_1: Q5.1 R24.1 | length 304.7
  Top Layer w50: Q5.1@660.47,992.16 661.59,993.28 v1(756.46,993.28)
  Bottom Layer w50: R24.1@548.14,993.17 v2(756.35,993.17)
NetQ6_1: Q6.1 R25.1 | length 209.8
  Top Layer w50: Q6.1@660.47,1463.17 Q6.1@661.47,1462.17
  Bottom Layer w50: R25.1@550.82,1462.06 759.03,1462.06 v2@759.14,1462.17
  other v2: 756.85,1463.69
NetQ7_1: Q7.1 R27.1 R29.1 | length 66
  Bottom Layer w22: R27.1@4886,753 4921.3,753 4934.69,766.39 4934.69,777.69 v1(4935,778)
NetQ8_1: Q8.1 R63.2 | length 56.8
  Bottom Layer w25: R63.2@1808.63,1815 1808.83,1814.8 1865.06,1814.8 Q8.1@1865.26,1814.6
NetQ9_1: Q9.1 R42.1 | length 64
  Bottom Layer w22: R42.1@5359,749 v1(5359,813)
NetQ10_1: Q10.1 R44.1 | length 64
  Bottom Layer w22: R44.1@4665,749 v1(4665,813)
NetQ11_1: Q11.1 R46.1 | length 106.8
  Top Layer w25: v1(5101,809) 5122.47,787.53 5153.5,787.53 Q11.1@5156.63,784.4
  Bottom Layer w25: v1(5101,809) R46.1@5142,809
NetQ11_3: Q11.3 R42.2 R43.1 | length 21.6
  Top Layer w12: Q11.3@5235.37,747 v1(5257,747)
NetQ12_1: Q12.1 R47.1 | length 130.8
  Top Layer w25: v1(4391,809) 4415.6,784.4 Q12.1@4458.63,784.4
  Bottom Layer w25: v1(4391,809) R47.1@4444,809
NetQ12_3: Q12.3 R44.2 R45.1 | length 32
  Top Layer w22: Q12.3@4536.37,750 4537.06,749.31 4567.69,749.31 v1(4568,749)
NetQ13_1: Q13.1 R52.1 | length 12.4
  Top Layer w25: Q13.1@5434.2,1330 5441.6,1322.6 Q13.1@5441.6,1320.63
NetQ14_1: Q14.1 R56.1 | length 12.4
  Top Layer w25: Q14.1@4749.2,1330 4756.6,1322.6 Q14.1@4756.6,1320.63
NetQ15_1: Q15.1 R89.2 | length 54
  Bottom Layer w22: Q15.1@5312.37,942.4 5312.79,941.98 5365.58,941.98 R89.2@5366,941.55
NetQ16_1: Q16.1 R90.2 | length 54
  Bottom Layer w22: Q16.1@4625.37,942.4 4625.79,941.98 4678.58,941.98 R90.2@4679,941.55
NetQ17_1: Q17.1 R95.1 R97.1
NetQ17_3: Q17.3 R52.2 R86.2 | length 344.7
  Top Layer w20: Q17.3@5323.37,1353.45 5323,1353.82 5323,1378.28 5334.72,1390 R52.2@5375,1390 5376.31,1391.31 5376.31,1423.31 v1(5377,1424)
  Top Layer w25: v1(5377,1262) R86.2@5443,1262
  Bottom Layer w25: v1(5377,1262) v1(5377,1424)
NetQ18_1: Q18.1 R28.2
NetQ18_3: Q18.3 R29.2
NetQ19_1: Q19.1 R62.1
NetQ21_1: Q21.1 R68.1 R107.1 | length 36.4
  Bottom Layer w25: R68.1@5575,753 5576,754 v1(5576,789)
NetQ24_1: Q24.1 R96.1 R98.1
NetQ24_3: Q24.3 R56.2 R88.2 | length 352.3
  Top Layer w20: Q24.3@4637.45,1353.82 4637.45,1378.28 4649.16,1390 4689.45,1390 v1(4689.45,1424)
  Top Layer w25: v1(4689.45,1262) R88.2@4764.45,1262
  Bottom Layer w25: v1(4689.45,1262) v1(4689.45,1424)
NetQ29_1: Q29.1 R99.2
NetQ30_1: Q30.1 R100.2
NetQ31_1: Q31.1 R33.2 | length 67
  Top Layer w22: v1@5753,675 5753.31,675.31 5753.31,688.88 5755.26,690.83 5755.26,699.46 5760.4,704.6 Q31.1@5762.37,704.6
  Bottom Layer w22: v1@5750.69,675.31 R33.2@5750.69,706.31 ; R33.2@5752,707 R33.2@5752.69,706.31 ; v1@5752.69,675.31 v1@5753,675
  other v1: 5751,675
NetQ31_3: Q31.3 R107.2
NetQ32_1: Q32.1 Q33.3 R71.2 | length 329.1
  Top Layer w25: Q32.1@1010.63,469.4 1011,469.03 v1(1011,443) ; R71.2@1073,339 1073,291 v1(1089,275) Q33.3@1089,243.37
  Bottom Layer w25: v1(1011,443) 1089,365 v1(1089,275)
NetQ33_1: Q33.1 R81.2 | length 7.7
  Top Layer w25: R81.2@957,270 R81.2@959.5,270 ; Q33.1@1006.99,276.76 Q33.1@1010.63,280.4
NetQ34_1: Q34.1 R87.2 | length 56.8
  Bottom Layer w25: R87.2@1286.2,1814.8 Q34.1@1342.43,1814.8 ; R87.2@1290,1815 R87.2@1290.2,1814.8 ; Q34.1@1346.43,1814.8 Q34.1@1346.63,1814.6
NetQ35_1: Q35.1 R106.2 | length 54.8
  Bottom Layer w25: R106.2@766.2,1814.8 Q35.1@820.43,1814.8 ; R106.2@771,1815 R106.2@771.2,1814.8 ; Q35.1@825.43,1814.8 Q35.1@825.63,1814.6
NetQ36_1: Q36.1 R108.2 | length 57.2
  Bottom Layer w25: Q36.1@1059.4,3092.61 1060.1,3093.31 1115.31,3093.31 R108.2@1116,3094
NetQ37_1: Q37.1 R109.2 | length 57.2
  Bottom Layer w25: Q37.1@1059.4,3616.63 1060.09,3617.31 1115.31,3617.31 R109.2@1116,3618
NetR5_2: R5.2 U1.7
NetR8_2: R8.2 U2.7 | length 68.2
  Top Layer w29.53: R8.2@2768.76,1744.89 U2.7@2836.93,1744.89
NetR37_1: R37.1 U14.1 | length 56
  Top Layer w22: U14.1@6002,1558.02 R37.1@6002,1614
NetR39_1: R39.1 U15.1 | length 56
  Top Layer w22: U15.1@6002,2240.02 R39.1@6002,2296
NetR78_1: R78.1 U8.1 | length 56
  Top Layer w22: U8.1@6002,876.02 R78.1@6002,932
NetR80_1: R80.1 U9.1 | length 51.8
  Top Layer w22: R80.1@6000,2883 6001,2882 6001,2833.02 U9.1@6002,2832.02
NetR111_1: R111.1 SB37.1 | length 123.5
  Top Layer w25: SB37.1@6148,533 v1(6148,616)
  Bottom Layer w25: R111.1@6140.33,579 6140.93,579 6143.43,581.5 6143.43,611.43 v1(6148,616)
NetR112_2: R112.2 R113.2 R114.2 | length 100.7
  Bottom Layer w25: R112.2@5939,579 R113.2@5989.33,579 R114.2@6039.67,579
NetR115_1: R115.1 SB38.1 | length 123.9
  Top Layer w25: SB38.1@6096,533 v1(6096,616)
  Bottom Layer w25: R115.1@6090,579 6092.5,579 6095,581.5 6095,615 v1(6096,616)
NetR116_1: R116.1 U17.2
NetSB7_1: SB7.1 U7.5
NetSB17_2: SB17.2 U16.5 | length 48.4
  Bottom Layer w12: U16.5@5754.44,2995.5 5754.69,2995.75 v1(5802.75,2995.75)
NetSB18_1: SB18.1 U16.10 | length 69.9
  Bottom Layer w12: v1(5512,2917) 5512,2935 5522.5,2945.5 U16.10@5559.56,2945.5
NRST: C73.2 J1.10 SW1.3 U5.14 | length 7462.5
  Top Layer w8: U5.14@3670.75,2504.47 U5.14@3670.99,2504.23
  Top Layer w10: U5.14@3670.99,2504.23 3672.14,2505.38 3710.38,2505.38 3790,2585 v1(3790,2654.19)
  Top Layer w12: J1.10@853.84,4099.75 853.84,3999.16 884,3969 4771,3969 4899.47,3840.53 v1(4899.47,3799.53) ; v1(3961.88,2654.19) 3962,2654.31 3962,2732 3985,2755 4182,2755 4286,2859 v1(4687,2859)
  Top Layer w22: v1(5235,3534) 5333.1,3534 v1(5375,3575.9) 5375,3641.61 SW1.3@5361,3655.61
  Bottom Layer w15: v1(3790,2654.19) v1(3961.88,2654.19)
  Bottom Layer w22: v1(4687,2859) 4687,3237 4984,3534 v1(5235,3534) ; v1(4899.47,3799.53) 5320.47,3799.53 5375.31,3744.69 C73.2@5375.31,3616.31 ; v1@5375.31,3575.9 C73.2@5375.31,3616.31 ; C73.2@5376,3617 C73.2@5375.31,3616.31
OSC_IN: C53.2 U5.8 X3.1 | length 238.5
  Top Layer w10: X3.1@3522.21,2672 3570,2672 3619.42,2622.58 U5.8@3670.75,2622.58
  Top Layer w12: X3.1@3520,2674.21 X3.1@3522.21,2672
  Top Layer w22: C53.2@3454,2675 3454.39,2674.61 3519.61,2674.61 X3.1@3520,2674.21
OSC_OUT: C78.2 U5.9 X3.2 | length 228
  Top Layer w10: X3.2@3520,2575.79 3596.79,2575.79 3623.9,2602.9 U5.9@3670.75,2602.9
  Top Layer w12: U5.9@3670.7,2602.95 U5.9@3670.75,2602.9
  Top Layer w22: C78.2@3454,2576 3454.11,2575.89 X3.2@3519.89,2575.89
OV_UV_EN: R81.1 R82.2 R117.1 R118.1 | length 1141.7
  Top Layer w25: R117.1@572,453 572,579 618,625 861.16,625 906,580.16 v1(906,507) 906,463 907,462 956,462 R82.2@957,463 ; v1(902,247.13) 902,225 917,210 R81.1@957,210
  Bottom Layer w25: v1(902,247.13) 970.13,247.13 1015,292 1015,369 906,478 v1(906,507)
PATCH: C77.1 L4.1 | length 58.1
  Top Layer w25: C77.1@6226.55,3728.45 C77.1@6227,3728 6227.55,3727.45 6227.55,3671.55 L4.1@6228.09,3671
PIR_OUT: R116.2 U5.96 | length 2866.7
  Top Layer w10: U5.96@3818.39,2829.28 3818.39,2993.39 3864,3039 v1(4034,3039) ; v1(4302,3405) v1(4302,3744)
  Bottom Layer w10: v1(4034,3039) 4302,3307 v1(4302,3405) ; v1(4302,3744) 4523,3965 5707,3965 5759,4017 R116.2@5759,4099
PM_CNTRL: Q3.1 R6.1 U5.59 | length 4316
  Top Layer w10: v1(4170,2508) 4232.58,2445.42 U5.59@4280.99,2445.42
  Top Layer w35: v1(926,3142) 1060,3008 1276,3008 v1(1361,2923)
  Bottom Layer w12: 3146,2976 3340.33,2976 3441,2875.33 3441,2598 3520,2519 4159,2519 v1(4170,2508)
  Bottom Layer w15: Q3.1@639,3292.77 647.25,3301.02 Q3.1@654.05,3301.02 ; v1(1361,2923) 1361,2886.9 1431.9,2816 2613,2816 2773,2976 3146,2976
  Bottom Layer w30: Q3.1@654.05,3301.02 684.98,3301.02 844,3142 v1(926,3142)
PROP_MIXING: K4.6 Q3.3 SB29.1 | length 1300.8
  Top Layer w25: SB29.1@614.84,3499 v1(724,3499)
  Bottom Layer w25: Q3.3@723.65,3330.17 v1@723.65,3499
  Bottom Layer w35: Q3.3@723.65,3330.17 764.17,3330.17 795,3361 1553.75,3361 K4.6@1681,3233.75
PS_MCU: SB37.2 SB38.2 U5.23 | length 4149.6
  Top Layer w10: U5.23@3670.75,2327.31 3750.68,2327.31 3764.65,2341.28 4001.28,2341.28 4015,2355 v1(4092,2355)
  Top Layer w12: v1(4186,2355) 4186,2308 4236,2258 4292,2258 4448,2102 v1(5169,2102)
  Top Layer w22: v1(5794,735) 5794,519 5840,473 SB38.2@6096,473 SB37.2@6148,473
  Bottom Layer w10: v1@4095,2354 4095.5,2354.5 4185.5,2354.5 v1(4186,2355)
  Bottom Layer w22: v1(5169,2102) 5673,2102 5794,1981 v1(5794,735)
PWM_BCK: P13.16 Q2.3
PWM_CNTRL: R60.2 U5.43 | length 2748.6
  Top Layer w10: U5.43@4074.29,2219.04 4074.29,2138.54 4225.83,1987 v1(4297,1987)
  Top Layer w12: v1(4414,3083) v1(4519,3083) ; v1(4487,2536.09) v1(4881,2536.09) ; v1(4881,2629.71) v1@4881,2740
  Bottom Layer w12: v1(4297,1987) 4297,2073 4466,2242 4466,2515.09 v1(4487,2536.09) ; R60.2@4343,3465 4343,3154 v1(4414,3083) ; v1@4518,3079.42 4518,2840 4610,2748 v1(4881,2748) ; v1(4881,2536.09) v1(4881,2629.71)
R_GND: P20.2 Q26.3 | length 122.5
  Bottom Layer w22: Q26.3@3745.13,36.85 3746.18,35.8 3778.25,35.8 3791.14,22.92 P20.2@3791.14,-47.83
RELAY_SIGNALS.RLY1_A_FILL: R63.1 U5.64 | length 3859
  Top Layer w8: v1(4231,2541) 4232.42,2542.42 4279.41,2542.42 U5.64@4280.99,2544
  Top Layer w20: v1(1712.32,1815) 2006.77,1815 2392.77,2201 2583,2201 2680,2298 2680,2829 2942.5,3091.5 v1(3351.5,3091.5)
  Bottom Layer w8: v1(3351.5,3091.5) 3505,2938 3505,2629.18 3568.99,2565.19 4206.81,2565.19 v1(4231,2541)
  Bottom Layer w20: v1(1712.32,1815) R63.1@1752.63,1815
RELAY_SIGNALS.RLY2_A_FLUSH: R87.1 U5.65 | length 4402.4
  Top Layer w8: v1(4228,2578) 4230.89,2578 4245.36,2563.53 U5.65@4280.99,2563.53
  Top Layer w20: v1(1185.69,1815) 1228.33,1815 1304.33,1891 2046,1891 2382,2227 2562,2227 2642,2307 2642,2844.74 2921.26,3124 v1(3322,3124)
  Bottom Layer w8: v1@3322.03,3124.03 3349.81,3124.03 3520,2953.85 3520,2651 3591.81,2579.19 4226.81,2579.19 v1(4228,2578)
  Bottom Layer w20: v1(1185.69,1815) R87.1@1226,1815
RELAY_SIGNALS.RLY3_M_SAVER: R106.1 U5.41 | length 3957.2
  Top Layer w10: U5.41@4034.92,2218.51 4034.96,2218.47 4034.96,2116.04 v1(4035,2116)
  Top Layer w20: v1(2360,2109) 2420.5,2169.5 v1(2912.5,2169.5)
  Top Layer w22: v1(3463.5,2169.5) 3463.5,1943.5 3498,1909 v1(3607,1909)
  Bottom Layer w20: R106.1@706,1815 709.96,1818.96 709.96,1845.96 843,1979 2230,1979 v1(2360,2109)
  Bottom Layer w22: v1(2912.5,2169.5) v1@3459.5,2169.5 ; v1(3607,1909) 3661,1963 3952,1963 4035,2046 v1(4035,2116)
RELAY_SIGNALS.RLY4_P_MIXING: R108.1 U5.77 | length 3562.5
  Top Layer w8: v1(3394,2956) 3422,2928 v1(3793,2928)
  Top Layer w10: U5.77@4192.4,2829.28 4192.4,2907.4 4210.19,2925.19 v1(4248,2925.19)
  Top Layer w35: v1@1207,3094 v1(1216,3094) 1288,3094 v1(1392,2990)
  Bottom Layer w8: v1(3793,2928) 3857,2864 3956,2864 4017.19,2925.19 v1(4248,2925.19)
  Bottom Layer w12: R108.1@1176,3091.5 R108.1@1176,3094
  Bottom Layer w20: R108.1@1176,3091.5 R108.1@1178.5,3094 ; v1(1392,2990) 1391.31,2989.31 1391.31,2895.93 1447.23,2840 2598,2840 2791.29,3033.29 3316.71,3033.29 v1(3394,2956)
  Bottom Layer w35: R108.1@1178.5,3094 v1(1216,3094)
RELAY_SIGNALS.RLY5_R_SAVER: R109.1 U5.83 | length 3584.2
  Top Layer w10: v1(3071,3190) 3929,3190 4074.29,3044.71 U5.83@4074.29,2829.28
  Bottom Layer w20: R109.1@1176,3618 1176,3665 1377,3866 2202,3866 2878,3190 v1(3071,3190)
RESIN_SAVER: K5.6 Q4.3 SB33.1 | length 1306
  Top Layer w20: SB33.1@614.84,3944 677.5,3944 686.5,3935 v1(729.31,3935)
  Top Layer w35: v1(729.31,3935) 1505,3935 K5.6@1681,3759
  Bottom Layer w12: Q4.3@723.65,3774.17 Q4.3@724.32,3774.84
  Bottom Layer w20: Q4.3@724.32,3774.84 724.32,3883.19 729.31,3888.18 v1(729.31,3935)
RF_DO: SB18.2 U5.69 | length 1255.8
  Top Layer w10: U5.69@4280.99,2642.27 4281.12,2642.13 4722.13,2642.13 4999,2919 SB18.2@5422,2919
RF_RSSI: U5.42 U16.14 | length 2646.1
  Top Layer w10: U5.42@4054.61,2219.04 4054.61,2134.28 4227.89,1961 5166,1961 5178.5,1973.5
  Top Layer w12: 5178.5,1973.5 5677,2472 v1(5677,2845)
  Bottom Layer w12: U16.14@5559.56,3045.5 5616.5,3045.5 5677,2985 v1(5677,2845)
RO1: C71.2 U16.1 X2.1 | length 163.3
  Bottom Layer w12: C71.2@5688.54,3137 5688.54,3105.54 5698.57,3095.5 U16.1@5754.44,3095.5
  Bottom Layer w25: C71.2@5688.54,3137 5688.54,3139.5 5691.34,3142.3 5691.34,3197.66
RO2: C72.2 U16.16 X2.2 | length 252.3
  Bottom Layer w12: X2.2@5469.94,3262 5477.25,3254.69 5482,3249.94 5479.69,3247.63 5479.69,3238.44 5482,3236.14 C72.2@5482,3121 ; C72.2@5477.25,3128.25 5487.75,3128.25 5487.75,3121 5487.75,3113.75 5492,3109.5 5492.52,3109.5 5506.52,3095.5 U16.16@5559.56,3095.5
RS_CNTRL: Q4.1 R9.1 U5.60 | length 4523.8
  Top Layer w10: v1(4216,2510) 4216,2506.31 4224.67,2497.64 4224.67,2484.19 4243.75,2465.1 U5.60@4280.99,2465.1
  Bottom Layer w15: Q4.1@639,3736.76 Q4.1@641.24,3739 ; Q4.1@639,3743.02 626,3743.02 633.21,3743.02 Q4.1@641.24,3735
  Bottom Layer w20: Q4.1@641.24,3735 744,3735 905,3896 2214,3896 2314,3796 2888.81,3221.19 3175.81,3221.19 3475,2922 3475,2614.91 3547.91,2542 4184,2542 v1(4216,2510)
RX_D1: SB19.1 U5.44 | length 3966.6
  Top Layer w10: U5.44@4093.98,2219.04 4093.98,2142.9 4216.88,2020 4474,2020
  Top Layer w12: 4474,2020 5190,2020 5647,2477 5647,2847 5611,2883 v1(5341,2883) ; v1(5341,2944) 5343,2946 5343,3066 5397,3120 v1(5397,3164) ; v1(5905,3558) 5952,3558 5994,3516 SB19.1@5994,3336
  Bottom Layer w12: v1(5341,2883) v1(5341,2944) ; v1@5396,3164 5396,3409 5545,3558 v1(5905,3558)
RX_D2: SB20.1 U5.45 | length 4126.2
  Top Layer w10: U5.45@4113.66,2219.04 4113.66,2147.25 4215.73,2045.19 5183.19,2045.19 5617,2479 5617,2673 ; v1(5905,3594) 5989,3594 6055,3528 6055,3306 6034,3285 SB20.1@5994,3285
  Top Layer w12: v1(5300,2883) 5338,2845 5588,2845 5617,2816 5617,2673 ; v1(5300,2944) 5300,3065 5362,3127 v1(5362,3164.2)
  Bottom Layer w12: v1(5300,2883) v1(5300,2944) ; v1(5362,3164.2) 5362,3421 5535,3594 v1(5905,3594)
RXIN1: R91.2 R101.1 U5.48 | length 2245.6
  Top Layer w10: U5.48@4172.72,2219.04 4172.72,2153.28 4202,2124 v1(4233,2124) v1@4233.5,2124
  Top Layer w25: v1(4234,1862) v1(5086,1862) ; v1(5415,1212) 5449,1212 R91.2@5450,1211 R101.1@5450,1160
  Bottom Layer w25: v1(4234,1862) v1@4234,2123 ; v1(5086,1862) 5293,1862 5415,1740 v1(5415,1212)
RXIN1#: Q13.3 R48.1 R100.1 R101.2 | length 887.6
  Top Layer w25: R48.1@5479,1449 Q13.3@5479,1399.37 5569.63,1399.37 5603,1366 v1(5603,1280.89) 5603,1191 5572,1160 R101.2@5510,1160
  Bottom Layer w22: R100.1@5366,1064 5544,1064 5603,1123 v1(5603,1280.89)
RXIN2: R92.2 R102.1 U5.79 | length 3160.3
  Top Layer w10: U5.79@4153.03,2829.28 4153.03,2951.03 4216,3014 v1(4909,3014)
  Top Layer w25: v1(4729.95,1211.5) R92.2@4763.95,1211.5 ; R102.1@4764.45,1160 R92.2@4764.45,1211 ; v1(4960,2139) 5141,2320 v1@5141,2869.41
  Bottom Layer w10: v1(4909,3014) 5087,3014 5141,2960 v1(5141,2871)
  Bottom Layer w25: v1(4729.95,1211.5) 4729.95,1908.95 v1(4960,2139)
RXIN2#: Q14.3 R49.1 R99.1 R102.2 | length 678.5
  Top Layer w22: v1(4759,1094) 4803,1094 4824.45,1115.45 R102.2@4824.45,1160
  Top Layer w25: Q14.3@4793.45,1399.37 4884.08,1399.37 4917.45,1366 4917.45,1191 4886.45,1160 R102.2@4824.45,1160 ; Q14.3@4794,1399.37 R49.1@4794,1449
  Bottom Layer w22: R99.1@4679,1066.55 4731.11,1066.55 4758.56,1094 v1(4759,1094)
SEL0: R55.1 SB42.1 U16.7 | length 302.2
  Top Layer w22: v1(5703,2923) 5703.44,2923 5733.44,2893 SB42.1@5838,2893
  Bottom Layer w12: R55.1@5731,2847 5729.53,2848.47 5729.53,2875.47 5703,2902 v1(5703,2923) 5705.22,2925.22 5705.22,2936.23 5714.5,2945.5 U16.7@5754.44,2945.5
SEL1: R104.1 SB41.1 U16.11 | length 109.2
  Top Layer w22: SB41.1@5482,2971 5482.69,2970.31 5512.69,2970.31 v1(5513,2970)
  Bottom Layer w12: R104.1@5482,2971 5482.5,2970.5 U16.11@5559.56,2970.5
SHDN: R64.2 SB7.2 U5.63 | length 4370.5
  Top Layer w10: U5.63@4280.99,2524.16 4353.16,2524.16 4365.09,2536.09 v1(4440,2536.09)
  Top Layer w22: v1(2542,1201) 3726,1201 v1(4268,1743)
  Bottom Layer w12: v1(4268,1743) 4268,2086 4440,2258 v1(4440,2536.09)
  Bottom Layer w22: v1@1804.31,361.65 2225.65,361.65 2542,678 v1(2542,1201)
  other v1: 1804,361.34
SHDN#: C75.1 R105.2 U16.8 | length 143.5
  Bottom Layer w12: U16.8@5754.44,2920.5 5791.5,2920.5 5813.03,2898.97 5835.7,2898.97 R105.2@5839,2895.67
  Bottom Layer w20: C75.1@5839,2847 R105.2@5839,2895.67
SNS_IN: SB3.2 U5.26 | length 4350.7
  Top Layer w10: U5.26@3739.65,2219.04 3739.65,2293.65 3769,2323 4101,2323 4115,2337 v1(4115,2425) ; v1(4352,2439) 4373,2439 4432,2498 v1(4922,2498) ; v1(6204,3212) 6204,3459 6274,3529 v1(6429,3529)
  Top Layer w12: v1(6429,3883) 6478,3932 SB3.2@6478,4166
  Bottom Layer w10: v1(4922,2498) 5867,2498 6204,2835 v1(6204,3212) ; v1(6429,3529) v1(6429,3883)
  Bottom Layer w12: v1(4115,2425) 4115.76,2424.24 4250.42,2424.24 4265.18,2439 v1(4352,2439)
SQ: SB6.1 U16.6 | length 71.5
  Bottom Layer w10: U16.6@5754.44,2970.5 5794.5,2970.5 5804,2961 v1@5804,2943
  other v1: 5804,2945
SW_1: C37.2 R18.1 SW2.3 U5.37 | length 2981.4
  Top Layer w10: v1(3830,2297) 3917,2297 3956.18,2257.82 U5.37@3956.18,2219.04
  Top Layer w22: SW2.3@2300.63,3618.8 SW2.3@2322.87,3641.04 ; SW2.3@2323.15,3640.76 v1(2323.15,3576) 2323.15,2706.85 v1(2580,2450)
  Bottom Layer w12: v1(2580,2450) 3792,2450 3830,2412 v1(3830,2297)
  Bottom Layer w22: v1@2322.94,3576 C37.2@2322.94,3617 R18.1@2322.94,3666.9
SW_2: C38.2 R19.1 SW3.3 U5.89 | length 1656.4
  Top Layer w10: v1@3956.18,2782 U5.89@3956.18,2829.28
  Top Layer w22: SW3.3@2831.48,3641.04 SW3.3@2833,3642.56 ; v1(2831.77,3576) SW3.3@2831.77,3640.76
  Bottom Layer w12: v1(2831.77,3576) 2833.99,3573.78 3001.55,3573.78 3649.33,2926 3755,2926 3899.13,2781.87 v1(3956.32,2781.87)
  Bottom Layer w22: v1(2831.77,3576) C38.2@2831.77,3615.47 ; C38.2@2831.77,3616.53 2832.3,3617.05 2832.3,3664.85 R19.1@2831.77,3665.38